# Altium PCB CW341_KintexUSTarget.PcbDoc (part 3 of 7)
Units mil, origin at the board's own origin, x right, y up, seen from the top; angles counter-clockwise.
Board outline 4566.97 x 5485 mil, 6 copper layers (Top Layer, Layer 2 (GND), Layer 3 (sig), Layer 4 (sig), Layer 5 (PWR), Bottom Layer), stack 61.068 mil thick; 157 components, 262 nets, 1869 pads, 1478 vias.
Unrouted connection lines stored in the file: 128.
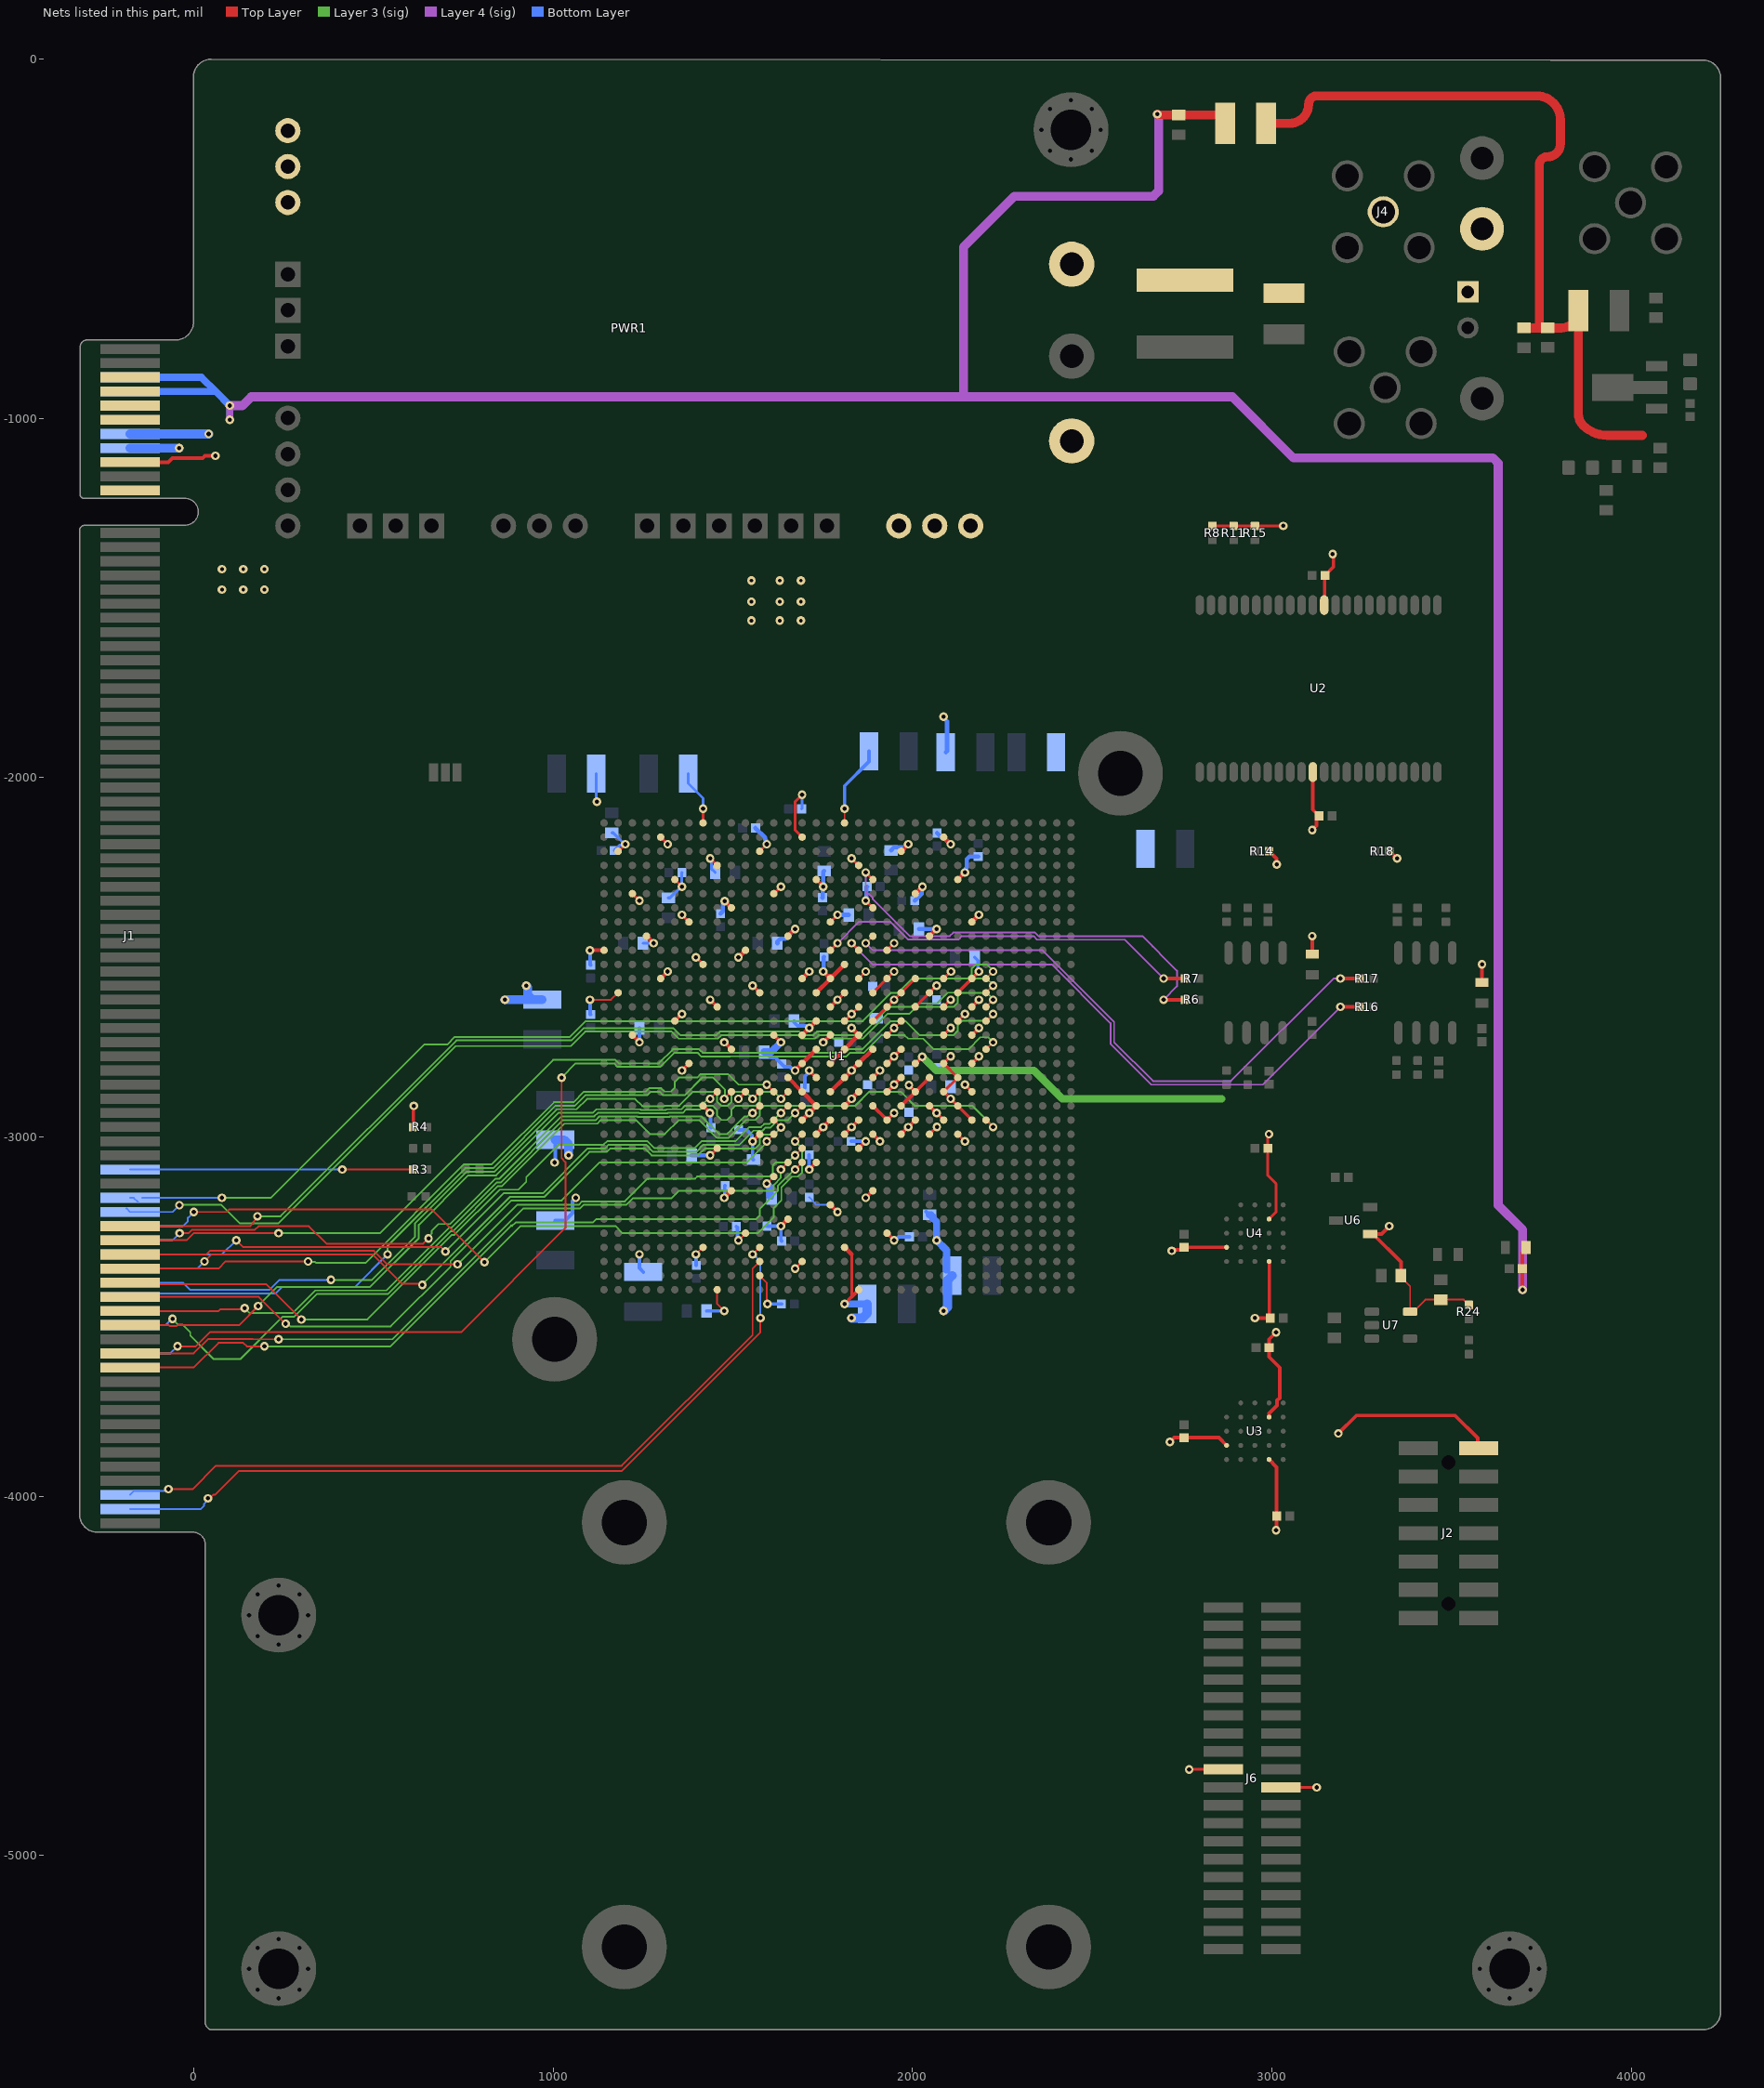
[diagram p6: the nets of this part, all layers, seen from the top]

## Via types
v1: diameter 24, hole 12, Top Layer to Bottom Layer, tented both sides, 1463 vias
v2: diameter 24, hole 10, Top Layer to Bottom Layer, tented both sides, 15 vias

## Nets (pads, with @x,y where several pads share a name; then routed paths per layer and width w, separated by ;. In a path a pad name is that pad's centre, name@x,y a point inside that pad or via, vN(x,y) a via of type N, cw(c..) or ccw(c..) an arc to the next point about the centre after c; other vN are vias at no path point) (continued)
CFG_D13_A5: (continued)
  Top Layer w5: J1.B67@-177.17,-3484.25 68.9,-3484.25 73.14,-3480.01 138.1,-3480.01 v1(141.73,-3476.38) ; v1(1555.12,-2933.07) U1.P23@1574.8,-2913.39
  Layer 3 (sig) w5: v1(141.73,-3476.38) 142.1,-3476.38 155.71,-3489.98 275.39,-3489.98 338.23,-3427.14 535.91,-3427.14 710.7,-3252.34 717.2,-3252.34 842.92,-3126.62 853.85,-3126.62 1027.58,-2952.89 1118.72,-2952.89 1128.67,-2942.94 1234.67,-2942.94 1236.09,-2944.36 1323.77,-2944.36 1325.19,-2942.94 1412.87,-2942.94 1461.87,-2991.94 1484.46,-2991.94 1495.88,-2980.52 1495.88,-2980 1533.3,-2942.57 1540.48,-2942.57 1549.98,-2933.07 v1(1555.12,-2933.07)
CFG_D14_A6: J1.A66 U1.R25 | length 1998.3
  Top Layer w5: v1(1476.38,-2893.7) U1.R25@1496.06,-2874.02
  Layer 3 (sig) w5: v1(539.37,-3326.77) 539.37,-3302.84 755.54,-3086.67 826.3,-3086.67 826.35,-3086.62 833.1,-3086.62 1006.84,-2912.89 1061.14,-2912.89 1090.14,-2883.89 1252.32,-2883.89 1252.38,-2883.83 1261.82,-2883.83 1271.45,-2874.2 1296.47,-2874.2 1306.1,-2883.83 1365.79,-2883.83 1414.79,-2834.83 1445.09,-2834.83 1478.47,-2868.21 1478.47,-2891.61 v1(1476.38,-2893.7)
  Bottom Layer w5: J1.A66@-177.17,-3444.88 -167.48,-3435.2 227.85,-3435.2 245.91,-3417.14 449,-3417.14 v1(539.37,-3326.77)
CFG_D15_A7: J1.B68 U1.R26 | length 1927.8
  Top Layer w5: J1.B68@-177.17,-3523.62 -69.26,-3523.62 -67.13,-3525.75 -47.3,-3525.75 -45.17,-3523.62 126,-3523.62 v1(179.12,-3470.48) ; v1(1437.01,-2893.7) U1.R26@1456.69,-2874.02
  Layer 3 (sig) w5: v1(179.12,-3470.48) 232.47,-3417.14 490.72,-3417.14 626.15,-3281.71 626.15,-3244.34 763.83,-3106.67 834.58,-3106.67 834.63,-3106.62 841.38,-3106.62 1015.12,-2932.89 1110.44,-2932.89 1120.38,-2922.94 1242.95,-2922.94 1244.37,-2924.36 1313.91,-2924.36 1315.46,-2922.81 1356.66,-2922.81 1366.27,-2913.2 1405.71,-2913.2 1415.34,-2903.57 1422,-2903.57 1431.87,-2893.7 v1(1437.01,-2893.7)
CFG_DONE: J1.A68 U1.N7 | length 2920.9
  Top Layer w5: U1.N7@2204.72,-2952.76 v1(2224.41,-2972.44)
  Layer 3 (sig) w5: v1(-59.06,-3506.25) -42.75,-3522.56 -30.45,-3522.56 -9.5,-3543.51 -9.5,-3553.08 55.35,-3617.93 130.09,-3617.93 248.03,-3499.98 279.53,-3499.98 342.37,-3437.14 540.05,-3437.14 714.84,-3262.34 721.34,-3262.34 847.06,-3136.62 857.99,-3136.62 1031.73,-2962.89 1122.87,-2962.89 1132.81,-2952.94 1230.53,-2952.94 1269.27,-2991.68 1271.19,-2991.68 1271.45,-2991.94 1311.19,-2991.94 1350.19,-2952.94 1405.84,-2952.94 1454.63,-3001.73 1457.51,-3001.73 1457.73,-3001.94 1488.6,-3001.94 1505.88,-2984.66 1505.88,-2984.14 1537.45,-2952.57 1563.2,-2952.57 1574.8,-2940.96 1574.8,-2925.18 1586.78,-2913.2 1840.87,-2913.2 1879.87,-2874.2 1967.07,-2874.2 2006.07,-2913.2 2167.26,-2913.2 2224.41,-2970.35 v1(2224.41,-2972.44)
  Bottom Layer w5: J1.A68@-177.17,-3523.62 -78.74,-3523.62 -61.37,-3506.25 v1(-59.06,-3506.25)
CFG_DOUT: J1.B70 U1.K21 | length 2072.5
  Top Layer w5: J1.B70@-177.17,-3602.36 0.02,-3602.36 39.56,-3562.83 163.96,-3562.83 164.13,-3562.99 v1(236.22,-3562.99) ; v1(1633.86,-3090.55) U1.K21@1653.54,-3070.87
  Layer 3 (sig) w5: v1(236.22,-3562.99) 552.79,-3562.99 753.53,-3362.25 916.99,-3198.79 1075.21,-3198.79 1084.97,-3189.03 1203.93,-3189.03 1222.07,-3170.89 1329.09,-3170.89 1350.19,-3149.79 1611.24,-3149.79 1614.17,-3146.86 1614.17,-3133.12 1633.86,-3113.43 v1(1633.86,-3090.55)
CFG_EMCCLK: J1.B71 U1.K20 | length 2127.7
  Top Layer w5: J1.B71@-177.17,-3641.73 0,-3641.73 68.91,-3572.83 137.79,-3572.83 147.64,-3582.68 v1@192.45,-3582.68 ; v1(1673.23,-3090.55) U1.K20@1692.91,-3070.87
  Layer 3 (sig) w5: v1(196.85,-3582.68) 547.24,-3582.68 763.78,-3366.14 883.86,-3246.06 ; 885.83,-3248.03 895.83,-3238.03 1110.44,-3238.03 1120.12,-3228.35 1564.82,-3228.35 1574.62,-3218.55 1574.62,-3200.95 1625.29,-3150.28 1625.29,-3136.14 1670.88,-3090.55 v1(1673.23,-3090.55)
CFG_INITB: J1.A70 U1.V7 | length 3109.3
  Top Layer w5: v1(-45,-3582.49) 5.75,-3582.49 44.94,-3543.31 744.27,-3543.31 1034.5,-3253.08 1034.5,-3069.95 1023.62,-3059.07 v1(1023.62,-2834.65) ; U1.V7@2204.72,-2755.91 v1(2224.41,-2736.22)
  Layer 3 (sig) w5: v1(1023.62,-2834.65) 1062.81,-2795.46 1169.49,-2795.46 1179.12,-2805.09 1219.39,-2805.09 1219.65,-2804.83 1260.66,-2804.83 1260.92,-2805.09 1298.13,-2805.09 1337.76,-2765.46 1401.84,-2765.46 1412.1,-2775.72 1492.74,-2775.72 1493,-2775.46 1617.24,-2775.46 1617.5,-2775.72 1816.18,-2775.72 1826.44,-2765.46 1864.87,-2765.46 1913.61,-2716.72 1978.53,-2716.72 1988.16,-2726.35 2029.48,-2726.35 2058.85,-2755.72 2155.97,-2755.72 2189.21,-2722.48 2210.66,-2722.48 v1(2224.41,-2736.22)
  Bottom Layer w5: J1.A70@-177.17,-3602.36 -64.87,-3602.36 v1(-45,-3582.49)